# Altium PCB 0060631C.PcbDoc (part 7 of 7)
Units mil, origin at the board's own origin, x right, y up, seen from the top; angles counter-clockwise.
Board outline 5480 x 8249 mil, 6 copper layers (Top Layer, Mid-Layer 1, Mid-Layer 2, Internal Plane 1, Internal Plane 2, Bottom Layer); 514 components, 269 nets, 1375 pads, 1334 vias.
Unrouted connection lines stored in the file: 126.
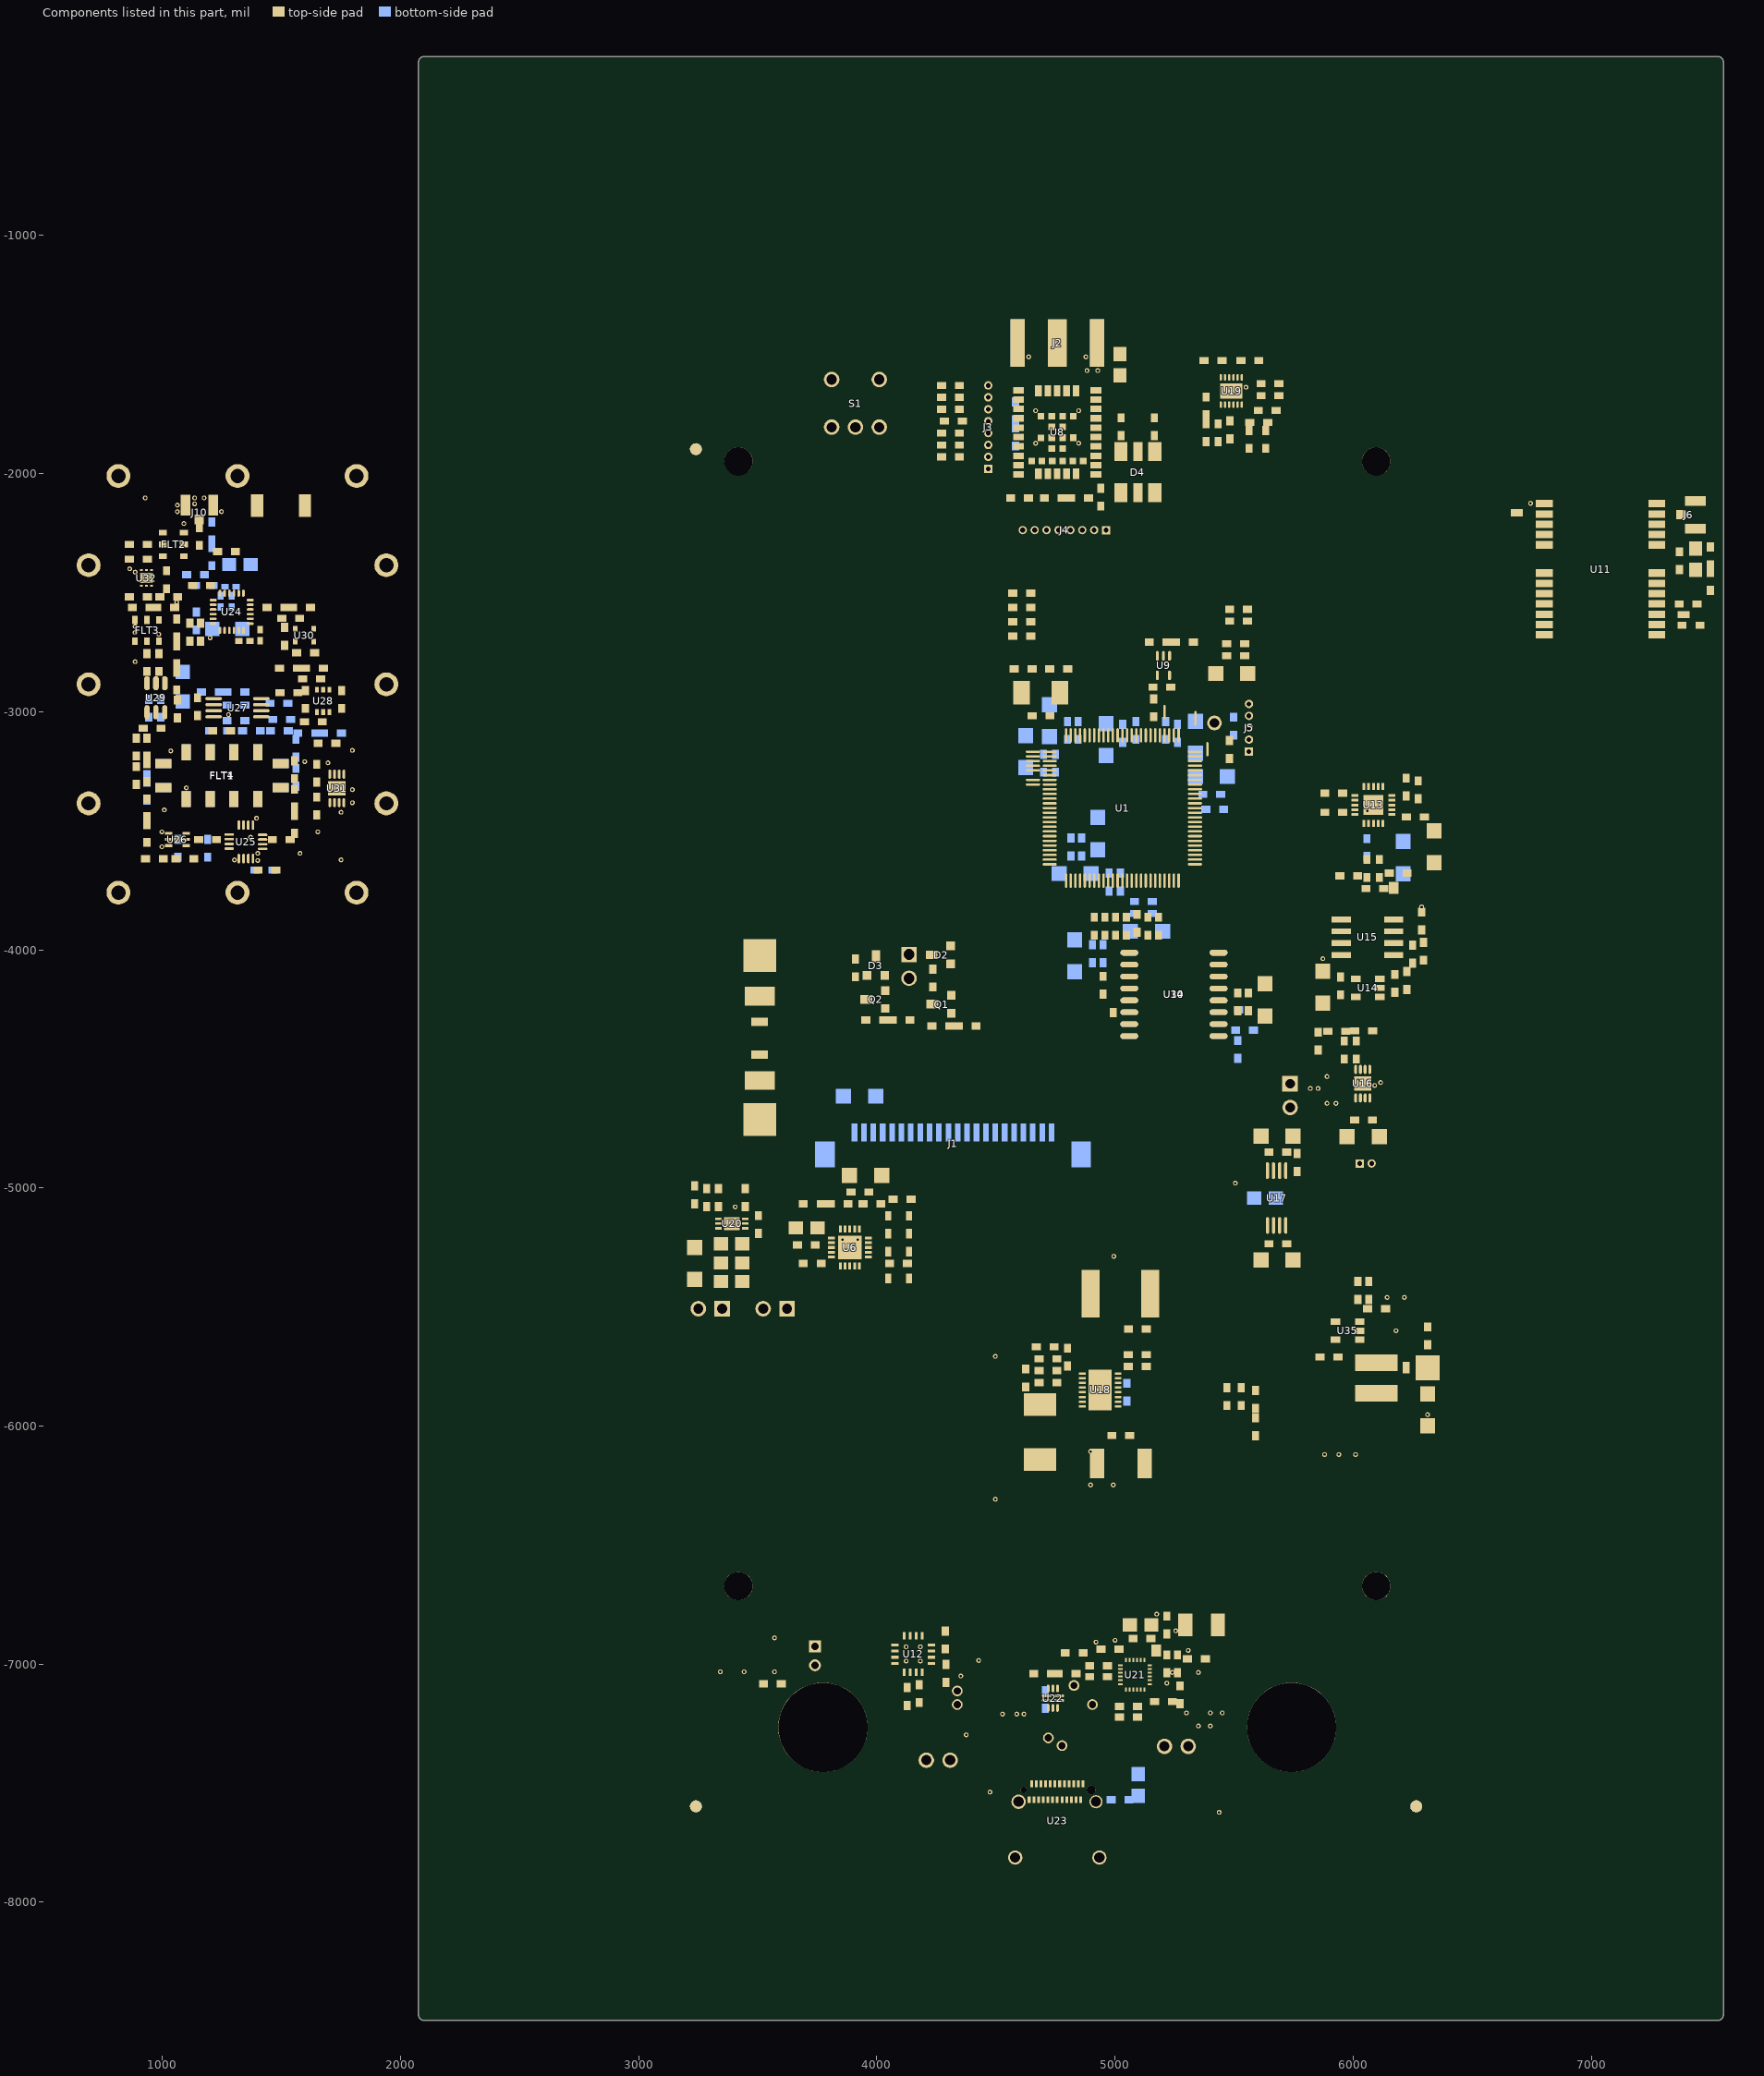
[diagram p11: the components of this part, seen from the top]

## Other copper (continued)
Internal Plane 1 (plane layer: these items are gaps in the copper):
  lines w8: 3115.5,-7605.5 3115.5,-7703.5 3205.5,-7703.5 ; 3115.5,-7578.5 3240.5,-7703.5 4545.5,-7703.5 4545.5,-7846.5 4969.5,-7846.5 4969.5,-7703.5 6274.5,-7703.5 6399.5,-7578.5 6399.5,-1793.5 5896.5,-1793.5 5896.5,-1352.5 4217.5,-1352.5 4217.5,-1422.5 3618.5,-1422.5 3618.5,-1793.5 3115.5,-1793.5 3115.5,-7578.5
  text "00-60163 REV.B" at 6990.05,-4902.68 h75 r90
  text "BLUE SLEUTH PRO LiPo" at 6640.05,-5069.35 h75 r90
Internal Plane 2 (plane layer: these items are gaps in the copper):
  lines w8: 3115.5,-7605.5 3115.5,-7703.5 3205.5,-7703.5 ; 3115.5,-7578.5 3240.5,-7703.5 4545.5,-7703.5 4545.5,-7846.5 4969.5,-7846.5 4969.5,-7703.5 6274.5,-7703.5 6399.5,-7578.5 6399.5,-1793.5 5896.5,-1793.5 5896.5,-1352.5 4217.5,-1352.5 4217.5,-1422.5 3618.5,-1422.5 3618.5,-1793.5 3115.5,-1793.5 3115.5,-7578.5
  text "00-60163 REV.B" at 6990.05,-4902.68 h75 r90
  text "BLUE SLEUTH PRO LiPo" at 6640.05,-5069.35 h75 r90

## Silkscreen, mask and mechanical layers (free items; w line width, h text height)
Top Overlay:
  lines w8: 3115.5,-7605.5 3115.5,-7703.5 3205.5,-7703.5 ; 3662.5,-5110 3687.5,-5110 ; 3725,-5135 3725,-5085 ; 3750,-5110 3725,-5110 ; 4754.5,-3649.6 4754.5,-3680.6 4785.5,-3680.6 ; 4754.5,-3159.6 4754.5,-3128.6 4785.5,-3128.6 ; 5157.5,-7703.5 5157.5,-7545.5 ; 5275.5,-3680.6 5292.8,-3680.6 5306.5,-3666.9 5306.5,-3649.6 ; 5275.5,-3128.6 5306.5,-3128.6 5306.5,-3159.6 ; 5357.5,-7703.5 5357.5,-7545.5 ; 3725,-5110 3687.5,-5135 3687.5,-5085 3725,-5110 ; 3115.5,-7578.5 3240.5,-7703.5 4545.5,-7703.5 4545.5,-7846.5 4969.5,-7846.5 4969.5,-7703.5 6274.5,-7703.5 6399.5,-7578.5 6399.5,-1793.5 5896.5,-1793.5 5896.5,-1352.5 4217.5,-1352.5 4217.5,-1422.5 3618.5,-1422.5 3618.5,-1793.5 3115.5,-1793.5 3115.5,-7578.5 ; 4357.02,-4095 ccw(c4520,-4095) 4520,-4257.98 ccw(c4520,-4095) 4682.98,-4095 ccw(c4520,-4095) 4520,-3932.02 ccw(c4520,-4095) 4357.02,-4095
  lines w20: 1350.3,-3546.2 1350.3,-3546.1 ; 1732.2,-3322.6 1732.3,-3322.6 ; 3391.2,-5150.4 3391.2,-5150.3 ; 6040.1,-4562.4 6040.2,-4562.4
  lines w25: 5030.4,-3404.6 5030.5,-3404.6 ; 5288.8,-3640.9 5288.9,-3640.9
  text "1" at 4374.5,-1991.12 h30 r90
  text "1" at 4956.38,-2379.5 h30
  text "+" at 1510.38,-2626.95 h52.5 r90
  text "+" at 6789.45,-2714.63 h52.5 r180
  text "1" at 5592,-3258.62 h30 r90
  text "+" at 6332.88,-3521.95 h52.5 r90
  text "+" at 5737.88,-4151.95 h52.5 r90
  text "BUZ" at 4436.67,-4156.25 h75
  text "+" at 5862.88,-4254.45 h52.5 r90
  text "1" at 5667,-4573.62 h30 r90
  text "+" at 5965.38,-4804.45 h52.5 r90
  text "00-60163 REV.B" at 6990.05,-4902.68 h75 r90
  text "+" at 3927.88,-4906.95 h52.5 r90
  text "BLUE SLEUTH PRO LiPo" at 6640.05,-5069.35 h75 r90
  text "COMPONENT SILKSCREEN" at 6815.05,-5069.35 h75 r90
  text "+" at 5652.88,-5379.45 h52.5 r90
  text "+" at 6285.38,-5896.95 h52.5 r90
  text "BLUE SLEUTH PRO LiPo" at 3270.5,-7189.43 h60 r90
  text "00-60163B" at 3503,-7624.5 h60
Bottom Overlay:
  lines w8: 3115.5,-7605.5 3115.5,-7703.5 3205.5,-7703.5 ; 4996.2,-7478.7 5046.2,-7478.7 ; 5021.2,-7503.7 5021.2,-7478.7 ; 5021.2,-7441.2 5021.2,-7416.2 ; 5021.2,-7478.7 5046.2,-7441.2 4996.2,-7441.2 5021.2,-7478.7 ; 3115.5,-7578.5 3240.5,-7703.5 4545.5,-7703.5 4545.5,-7846.5 4969.5,-7846.5 4969.5,-7703.5 6274.5,-7703.5 6399.5,-7578.5 6399.5,-1793.5 5896.5,-1793.5 5896.5,-1352.5 4217.5,-1352.5 4217.5,-1422.5 3618.5,-1422.5 3618.5,-1793.5 3115.5,-1793.5 3115.5,-7578.5
  text "+" at 1202.13,-2434.45 h52.5 r90
  text "+" at 1164.63,-2756.95 h52.5 r90
  text "+" at 1049.63,-2761.95 h52.5 r90
  text "+" at 4786.95,-3197.88 h52.5
  text "+" at 4924.45,-3242.88 h52.5
  text "+" at 5411.95,-3245.38 h52.5
  text "+" at 4584.45,-3270.38 h52.5
  text "+" at 5301.95,-3322.88 h52.5
  text "+" at 6114.63,-3561.95 h52.5 r90
  text "+" at 5009.45,-3637.88 h52.5
  text "+" at 4931.95,-3795.38 h52.5
  text "+" at 5286.95,-3935.38 h52.5
  text "+" at 4737.13,-4126.95 h52.5 r90
  text "+" at 3967.13,-4574.45 h52.5 r90
  text "00-60163 REV.B" at 6867.55,-4902.68 h75 r90
  text "SOLDER SILKSCREEN" at 6697.55,-5001.02 h75 r90
  text "BLUE SLEUTH PRO LiPo" at 6517.55,-5069.35 h75 r90
Top Paste:
  lines w8: 3115.5,-7605.5 3115.5,-7703.5 3205.5,-7703.5 ; 3115.5,-7578.5 3240.5,-7703.5 4545.5,-7703.5 4545.5,-7846.5 4969.5,-7846.5 4969.5,-7703.5 6274.5,-7703.5 6399.5,-7578.5 6399.5,-1793.5 5896.5,-1793.5 5896.5,-1352.5 4217.5,-1352.5 4217.5,-1422.5 3618.5,-1422.5 3618.5,-1793.5 3115.5,-1793.5 3115.5,-7578.5
  text "00-60163 REV.B" at 6990.05,-4902.68 h75 r90
  text "BLUE SLEUTH PRO LiPo" at 6640.05,-5069.35 h75 r90
Bottom Paste:
  lines w8: 3115.5,-7605.5 3115.5,-7703.5 3205.5,-7703.5 ; 3115.5,-7578.5 3240.5,-7703.5 4545.5,-7703.5 4545.5,-7846.5 4969.5,-7846.5 4969.5,-7703.5 6274.5,-7703.5 6399.5,-7578.5 6399.5,-1793.5 5896.5,-1793.5 5896.5,-1352.5 4217.5,-1352.5 4217.5,-1422.5 3618.5,-1422.5 3618.5,-1793.5 3115.5,-1793.5 3115.5,-7578.5
  text "00-60163 REV.B" at 6867.55,-4902.68 h75 r90
  text "BLUE SLEUTH PRO LiPo" at 6517.55,-5069.35 h75 r90
Top Solder:
  lines w8: 3115.5,-7605.5 3115.5,-7703.5 3205.5,-7703.5 ; 3115.5,-7578.5 3240.5,-7703.5 4545.5,-7703.5 4545.5,-7846.5 4969.5,-7846.5 4969.5,-7703.5 6274.5,-7703.5 6399.5,-7578.5 6399.5,-1793.5 5896.5,-1793.5 5896.5,-1352.5 4217.5,-1352.5 4217.5,-1422.5 3618.5,-1422.5 3618.5,-1793.5 3115.5,-1793.5 3115.5,-7578.5
  lines w20: 867.5,-2475 867.5,-2400 ; 982.5,-3120 1525,-3120 ; 1010,-3417.5 1502.5,-3417.5 ; 867.5,-3065 867.5,-2642.5 875,-2650 875,-3057.5 867.5,-3065
  lines w30: 872.5,-2255 872.5,-2102.5 1062.5,-2102.5 ; 1142.5,-2102.5 1177.5,-2102.5 ; 1417.5,-2332.5 1800,-2332.5 ; 1507.5,-3672.5 1802.5,-3672.5 1802.5,-3107.5 ; 3377.5,-5135 3377.5,-5112.5 3405,-5112.5 3405,-5132.5
  lines w75: 695,-3760 1945,-3760 1945,-2010 695,-2010 695,-3760
  text "00-60163 REV.B" at 6990.05,-4902.68 h75 r90
  text "BLUE SLEUTH PRO LiPo" at 6640.05,-5069.35 h75 r90
  text "SOLDERMASK COMPONENT" at 6815.05,-5069.35 h75 r90
Bottom Solder:
  lines w8: 3115.5,-7605.5 3115.5,-7703.5 3205.5,-7703.5 ; 3115.5,-7578.5 3240.5,-7703.5 4545.5,-7703.5 4545.5,-7846.5 4969.5,-7846.5 4969.5,-7703.5 6274.5,-7703.5 6399.5,-7578.5 6399.5,-1793.5 5896.5,-1793.5 5896.5,-1352.5 4217.5,-1352.5 4217.5,-1422.5 3618.5,-1422.5 3618.5,-1793.5 3115.5,-1793.5 3115.5,-7578.5
  lines w30: 4602.5,-1385 4610,-1385 ; 4615,-1525 4590,-1525 4590,-1367.5 4905,-1367.5 4905,-1525 ; 4662.5,-1460 4662.5,-1457.5 4835,-1457.5 4835,-1442.5 4662.5,-1442.5 4662.5,-1477.5 4857.5,-1477.5 4857.5,-1420 4640,-1420 4640,-1502.5 4882.5,-1502.5 4882.5,-1395 4617.5,-1395 4617.5,-1525 4905,-1525 ; 4915,-1367.5 4925,-1367.5 4925,-1525 4905,-1525
  text "00-60163 REV.B" at 6867.55,-4902.68 h75 r90
  text "BLUE SLEUTH PRO LiPo" at 6517.55,-5069.35 h75 r90
  text "SOLDERMASK SOLDER SIDE" at 6700.05,-5149.9 h75 r90
Drill Guide:
  text "00-60163 REV.B" at 6990.05,-4902.68 h75 r90
  text "BLUE SLEUTH PRO LiPo" at 6640.05,-5069.35 h75 r90
Mechanical 1:
  lines w2.5: 5002,-3404.6 5054,-3404.6 ; 5030.5,-3435.5 5030.5,-3374.5 ; 5877.28,-2477 ccw(c5892.9,-2477) 5892.9,-2492.62 ccw(c5892.9,-2477) 5908.52,-2477 ccw(c5892.9,-2477) 5892.9,-2461.38 ccw(c5892.9,-2477) 5877.28,-2477
  lines w8: 3115.5,-7605.5 3115.5,-7703.5 3205.5,-7703.5 ; 3662.5,-5110 3687.5,-5110 ; 3725,-5135 3725,-5085 ; 3750,-5110 3725,-5110 ; 4257.5,-7720 4257.5,-7637.5 ; 4754.5,-3649.6 4754.5,-3680.6 4785.5,-3680.6 ; 4754.5,-3159.6 4754.5,-3128.6 4785.5,-3128.6 ; 4757.5,-7938 4757.5,-7869.5 ; 4757.5,-1406 4757.5,-1300 ; 5157.5,-7703.5 5157.5,-7545.5 ; 5257.5,-7714 5257.5,-7635.5 ; 5275.5,-3680.6 5292.8,-3680.6 5306.5,-3666.9 5306.5,-3649.6 ; 5275.5,-3128.6 5306.5,-3128.6 5306.5,-3159.6 ; 5357.5,-7703.5 5357.5,-7545.5 ; 3725,-5110 3687.5,-5135 3687.5,-5085 3725,-5110 ; 3115.5,-7578.5 3240.5,-7703.5 4545.5,-7703.5 4545.5,-7846.5 4969.5,-7846.5 4969.5,-7703.5 6274.5,-7703.5 6399.5,-7578.5 6399.5,-1793.5 5896.5,-1793.5 5896.5,-1352.5 4217.5,-1352.5 4217.5,-1422.5 3618.5,-1422.5 3618.5,-1793.5 3115.5,-1793.5 3115.5,-7578.5 ; 3293.5,-6672.5 ccw(c3418.5,-6672.5) 3418.5,-6797.5 ccw(c3418.5,-6672.5) 3543.5,-6672.5 ccw(c3418.5,-6672.5) 3418.5,-6547.5 ccw(c3418.5,-6672.5) 3293.5,-6672.5 ; 3293.5,-1948.5 ccw(c3418.5,-1948.5) 3418.5,-2073.5 ccw(c3418.5,-1948.5) 3543.5,-1948.5 ccw(c3418.5,-1948.5) 3418.5,-1823.5 ccw(c3418.5,-1948.5) 3293.5,-1948.5 ; 4357.02,-4095 ccw(c4520,-4095) 4520,-4257.98 ccw(c4520,-4095) 4682.98,-4095 ccw(c4520,-4095) 4520,-3932.02 ccw(c4520,-4095) 4357.02,-4095 ; 5971.5,-6672.5 ccw(c6096.5,-6672.5) 6096.5,-6797.5 ccw(c6096.5,-6672.5) 6221.5,-6672.5 ccw(c6096.5,-6672.5) 6096.5,-6547.5 ccw(c6096.5,-6672.5) 5971.5,-6672.5 ; 5971.5,-1948.5 ccw(c6096.5,-1948.5) 6096.5,-2073.5 ccw(c6096.5,-1948.5) 6221.5,-1948.5 ccw(c6096.5,-1948.5) 6096.5,-1823.5 ccw(c6096.5,-1948.5) 5971.5,-1948.5
  lines w20: 3391.2,-5150.4 3391.2,-5150.3 ; 3845.3,-3666.2 3845.3,-3666.1 ; 4227.2,-3442.6 4227.3,-3442.6 ; 6040.1,-4562.4 6040.2,-4562.4
  lines w25: 5030.4,-3404.6 5030.5,-3404.6 ; 5288.8,-3640.9 5288.9,-3640.9
  text "1" at 4374.5,-1991.12 h30 r90
  text "1" at 4956.38,-2379.5 h30
  text "+" at 4005.38,-2746.95 h52.5 r90
  text "+" at 5639.45,-2789.63 h52.5 r180
  text "1" at 5592,-3258.62 h30 r90
  text "+" at 6332.88,-3521.95 h52.5 r90
  text "+" at 5737.88,-4151.95 h52.5 r90
  text "BUZ" at 4436.67,-4156.25 h75
  text "+" at 5862.88,-4254.45 h52.5 r90
  text "1" at 5667,-4573.62 h30 r90
  text "+" at 5965.38,-4804.45 h52.5 r90
  text "00-60163 REV.B" at 6990.05,-4902.68 h75 r90
  text "+" at 3927.88,-4906.95 h52.5 r90
  text "BLUE SLEUTH PRO LiPo" at 6640.05,-5069.35 h75 r90
  text "COMPONENT SILKSCREEN" at 6815.05,-5069.35 h75 r90
  text "+" at 5652.88,-5379.45 h52.5 r90
  text "+" at 6285.38,-5896.95 h52.5 r90
  text "BLUE SLEUTH PRO LiPo" at 3270.5,-7189.43 h60 r90
  text "00-60163B" at 3503,-7624.5 h60
Mechanical 2:
  lines w8: 3115.5,-7605.5 3115.5,-7703.5 3205.5,-7703.5 ; 4996.2,-7478.7 5046.2,-7478.7 ; 5021.2,-7503.7 5021.2,-7478.7 ; 5021.2,-7441.2 5021.2,-7416.2 ; 5021.2,-7478.7 5046.2,-7441.2 4996.2,-7441.2 5021.2,-7478.7 ; 3115.5,-7578.5 3240.5,-7703.5 4545.5,-7703.5 4545.5,-7846.5 4969.5,-7846.5 4969.5,-7703.5 6274.5,-7703.5 6399.5,-7578.5 6399.5,-1793.5 5896.5,-1793.5 5896.5,-1352.5 4217.5,-1352.5 4217.5,-1422.5 3618.5,-1422.5 3618.5,-1793.5 3115.5,-1793.5 3115.5,-7578.5
  text "+" at 3697.13,-2554.45 h52.5 r90
  text "+" at 3659.63,-2876.95 h52.5 r90
  text "+" at 3544.63,-2881.95 h52.5 r90
  text "+" at 4786.95,-3197.88 h52.5
  text "+" at 4924.45,-3242.88 h52.5
  text "+" at 5411.95,-3245.38 h52.5
  text "+" at 4584.45,-3270.38 h52.5
  text "+" at 5301.95,-3322.88 h52.5
  text "+" at 6114.63,-3561.95 h52.5 r90
  text "+" at 5009.45,-3637.88 h52.5
  text "+" at 4931.95,-3795.38 h52.5
  text "+" at 5286.95,-3935.38 h52.5
  text "+" at 4737.13,-4126.95 h52.5 r90
  text "+" at 3967.13,-4574.45 h52.5 r90
  text "00-60163 REV.B" at 6867.55,-4902.68 h75 r90
  text "SOLDER SILKSCREEN" at 6697.55,-5001.02 h75 r90
  text "BLUE SLEUTH PRO LiPo" at 6517.55,-5069.35 h75 r90
Mechanical 4:
  lines w8: 3115.5,-7605.5 3115.5,-7703.5 3205.5,-7703.5 ; 3115.5,-7578.5 3240.5,-7703.5 4545.5,-7703.5 4545.5,-7846.5 4969.5,-7846.5 4969.5,-7703.5 6274.5,-7703.5 6399.5,-7578.5 6399.5,-1793.5 5896.5,-1793.5 5896.5,-1352.5 4217.5,-1352.5 4217.5,-1422.5 3618.5,-1422.5 3618.5,-1793.5 3115.5,-1793.5 3115.5,-7578.5
  text "00-60163 REV.B" at 6990.05,-4902.68 h75 r90
  text "BLUE SLEUTH PRO LiPo" at 6640.05,-5069.35 h75 r90
Mechanical 5:
  lines w8: 3115.5,-7605.5 3115.5,-7703.5 3205.5,-7703.5 ; 3115.5,-7578.5 3240.5,-7703.5 4545.5,-7703.5 4545.5,-7846.5 4969.5,-7846.5 4969.5,-7703.5 6274.5,-7703.5 6399.5,-7578.5 6399.5,-1793.5 5896.5,-1793.5 5896.5,-1352.5 4217.5,-1352.5 4217.5,-1422.5 3618.5,-1422.5 3618.5,-1793.5 3115.5,-1793.5 3115.5,-7578.5
  text "00-60163 REV.B" at 6990.05,-4902.68 h75 r90
  text "BLUE SLEUTH PRO LiPo" at 6640.05,-5069.35 h75 r90
Mechanical 6:
  lines w8: 3115.5,-7605.5 3115.5,-7703.5 3205.5,-7703.5 ; 3115.5,-7578.5 3240.5,-7703.5 4545.5,-7703.5 4545.5,-7846.5 4969.5,-7846.5 4969.5,-7703.5 6274.5,-7703.5 6399.5,-7578.5 6399.5,-1793.5 5896.5,-1793.5 5896.5,-1352.5 4217.5,-1352.5 4217.5,-1422.5 3618.5,-1422.5 3618.5,-1793.5 3115.5,-1793.5 3115.5,-7578.5
  text "00-60163 REV.B" at 6990.05,-4902.68 h75 r90
  text "BLUE SLEUTH PRO LiPo" at 6640.05,-5069.35 h75 r90
Mechanical 7:
  lines w8: 3115.5,-7605.5 3115.5,-7703.5 3205.5,-7703.5 ; 3115.5,-7578.5 3240.5,-7703.5 4545.5,-7703.5 4545.5,-7846.5 4969.5,-7846.5 4969.5,-7703.5 6274.5,-7703.5 6399.5,-7578.5 6399.5,-1793.5 5896.5,-1793.5 5896.5,-1352.5 4217.5,-1352.5 4217.5,-1422.5 3618.5,-1422.5 3618.5,-1793.5 3115.5,-1793.5 3115.5,-7578.5
  text "00-60163 REV.B" at 6990.05,-4902.68 h75 r90
  text "BLUE SLEUTH PRO LiPo" at 6640.05,-5069.35 h75 r90
Mechanical 8:
  lines w8: 3115.5,-7605.5 3115.5,-7703.5 3205.5,-7703.5 ; 3115.5,-7578.5 3240.5,-7703.5 4545.5,-7703.5 4545.5,-7846.5 4969.5,-7846.5 4969.5,-7703.5 6274.5,-7703.5 6399.5,-7578.5 6399.5,-1793.5 5896.5,-1793.5 5896.5,-1352.5 4217.5,-1352.5 4217.5,-1422.5 3618.5,-1422.5 3618.5,-1793.5 3115.5,-1793.5 3115.5,-7578.5
  text "00-60163 REV.B" at 6990.05,-4902.68 h75 r90
  text "BLUE SLEUTH PRO LiPo" at 6640.05,-5069.35 h75 r90
Mechanical 9:
  lines w8: 3115.5,-7605.5 3115.5,-7703.5 3205.5,-7703.5 ; 3115.5,-7578.5 3240.5,-7703.5 4545.5,-7703.5 4545.5,-7846.5 4969.5,-7846.5 4969.5,-7703.5 6274.5,-7703.5 6399.5,-7578.5 6399.5,-1793.5 5896.5,-1793.5 5896.5,-1352.5 4217.5,-1352.5 4217.5,-1422.5 3618.5,-1422.5 3618.5,-1793.5 3115.5,-1793.5 3115.5,-7578.5
  text "00-60163 REV.B" at 6990.05,-4902.68 h75 r90
  text "BLUE SLEUTH PRO LiPo" at 6640.05,-5069.35 h75 r90
Mechanical 10:
  lines w8: 3115.5,-7605.5 3115.5,-7703.5 3205.5,-7703.5 ; 3115.5,-7578.5 3240.5,-7703.5 4545.5,-7703.5 4545.5,-7846.5 4969.5,-7846.5 4969.5,-7703.5 6274.5,-7703.5 6399.5,-7578.5 6399.5,-1793.5 5896.5,-1793.5 5896.5,-1352.5 4217.5,-1352.5 4217.5,-1422.5 3618.5,-1422.5 3618.5,-1793.5 3115.5,-1793.5 3115.5,-7578.5
  text "00-60163 REV.B" at 6990.05,-4902.68 h75 r90
  text "BLUE SLEUTH PRO LiPo" at 6640.05,-5069.35 h75 r90
Mechanical 11:
  lines w8: 3115.5,-7605.5 3115.5,-7703.5 3205.5,-7703.5 ; 3115.5,-7578.5 3240.5,-7703.5 4545.5,-7703.5 4545.5,-7846.5 4969.5,-7846.5 4969.5,-7703.5 6274.5,-7703.5 6399.5,-7578.5 6399.5,-1793.5 5896.5,-1793.5 5896.5,-1352.5 4217.5,-1352.5 4217.5,-1422.5 3618.5,-1422.5 3618.5,-1793.5 3115.5,-1793.5 3115.5,-7578.5
  text "00-60163 REV.B" at 6990.05,-4902.68 h75 r90
  text "BLUE SLEUTH PRO LiPo" at 6640.05,-5069.35 h75 r90
Mechanical 12:
  lines w8: 3115.5,-7605.5 3115.5,-7703.5 3205.5,-7703.5 ; 3115.5,-7578.5 3240.5,-7703.5 4545.5,-7703.5 4545.5,-7846.5 4969.5,-7846.5 4969.5,-7703.5 6274.5,-7703.5 6399.5,-7578.5 6399.5,-1793.5 5896.5,-1793.5 5896.5,-1352.5 4217.5,-1352.5 4217.5,-1422.5 3618.5,-1422.5 3618.5,-1793.5 3115.5,-1793.5 3115.5,-7578.5
  text "00-60163 REV.B" at 6990.05,-4902.68 h75 r90
  text "BLUE SLEUTH PRO LiPo" at 6640.05,-5069.35 h75 r90
Mechanical 13:
  lines w8: 3115.5,-7605.5 3115.5,-7703.5 3205.5,-7703.5 ; 3115.5,-7578.5 3240.5,-7703.5 4545.5,-7703.5 4545.5,-7846.5 4969.5,-7846.5 4969.5,-7703.5 6274.5,-7703.5 6399.5,-7578.5 6399.5,-1793.5 5896.5,-1793.5 5896.5,-1352.5 4217.5,-1352.5 4217.5,-1422.5 3618.5,-1422.5 3618.5,-1793.5 3115.5,-1793.5 3115.5,-7578.5
  text "00-60163 REV.B" at 6990.05,-4902.68 h75 r90
  text "BLUE SLEUTH PRO LiPo" at 6640.05,-5069.35 h75 r90
Mechanical 14:
  text "RECESS BOARD UNDER S1 FOR TOGGLE BUTTON" at 3543.52,-421.5 h90
  text "R93: WSLP0805R0100FEB or 200FEB ?" at 3804.52,-700.5 h90
  text "SAME ON WOLFHOUND ULTRA" at 4235.83,-872.5 h90
  text "CHANGE TITLE TO BLUE SLEUTH PRO LiPo" at 3685.02,-8214.5 h90
  text "FIX SHORTED \"THM\" VIA TO +3.3V, RIGHT OF R85" at 3315.02,-8470.5 h90
Drill Drawing:
  lines w8: -4,-2704 3609,-2704 ; -4,-2700 -4,0 ; -4,4 3609,4 ; 0,-2500 3605,-2500 ; 0,-2350 3605,-2350 ; 0,-2200 3605,-2200 ; 0,-2050 3605,-2050 ; 0,-1900 3605,-1900 ; 0,-1750 3605,-1750 ; 0,-1600 3605,-1600 ; 0,-1450 3605,-1450 ; 0,-1300 3605,-1300 ; 0,-1150 3605,-1150 ; 0,-1000 3605,-1000 ; 0,-850 3605,-850 ; 0,-700 3605,-700 ; 0,-550 3605,-550 ; 0,-400 3605,-400 ; 0,-396 3605,-396 ; 0,-200 3605,-200 ; 0,-196 3605,-196 ; 128.5,-2125 228.5,-2125 ; 128.5,-2025 228.5,-1925 ; 128.5,-1925 228.5,-2025 ; 153.5,-1075 203.5,-1075 ; 153.5,-625 203.5,-625 ; 153.5,-500 203.5,-450 ; 153.5,-450 203.5,-500 ; 163.5,-1830 173.5,-1840 183.5,-1840 193.5,-1830 ; 168.5,-2275 188.5,-2275 ; 178.5,-2285 178.5,-2265 ; 178.5,-2175 178.5,-2075 ; 178.5,-1100 178.5,-1050 ; 178.5,-650 178.5,-600 ; 357,-2500 357,-200 ; 361,-2500 361,-200 ; 1173.17,-2500 1173.17,-200 ; 1951.83,-2700 1951.83,-200 ; 2490.83,-2700 2490.83,-200 ; 3609,-2700 3609,0 ; 128.5,-2475 128.5,-2375 ; 128.5,-2475 228.5,-2475 ; 128.5,-2475 228.5,-2375 ; 128.5,-2375 228.5,-2375 ; 128.5,-2375 228.5,-2475 ; 153.5,-950 153.5,-900 ; 153.5,-950 203.5,-950 ; 153.5,-950 203.5,-900 ; 153.5,-900 203.5,-900 ; 153.5,-900 203.5,-950 ; 203.5,-950 203.5,-900 ; 228.5,-2475 228.5,-2375 ; 0,-2700 3605,-2700 3605,0 0,0 0,-2700 ; 128.5,-2275 178.5,-2225 228.5,-2275 178.5,-2325 128.5,-2275 ; 153.5,-1835 153.5,-1815 168.5,-1800 188.5,-1800 203.5,-1815 203.5,-1835 188.5,-1850 168.5,-1850 153.5,-1835 ; 153.5,-1685 153.5,-1665 178.5,-1690 203.5,-1665 203.5,-1685 178.5,-1660 153.5,-1685 ; 153.5,-1535 178.5,-1510 203.5,-1535 153.5,-1535 ; 153.5,-1385 153.5,-1365 168.5,-1350 188.5,-1350 203.5,-1365 203.5,-1385 188.5,-1400 168.5,-1400 153.5,-1385 ; 153.5,-1225 153.5,-1200 178.5,-1200 178.5,-1250 203.5,-1250 203.5,-1225 153.5,-1225 ; 153.5,-1100 153.5,-1050 203.5,-1050 203.5,-1100 153.5,-1100 ; 153.5,-775 178.5,-750 203.5,-775 178.5,-800 153.5,-775 ; 168.5,-1815 173.5,-1815 173.5,-1810 168.5,-1810 168.5,-1815 ; 183.5,-1815 183.5,-1810 188.5,-1810 188.5,-1815 183.5,-1815
  text ".Legend" at 0,0 h60
  text "00-60163 REV.B" at 6990.05,-4902.68 h75 r90
  text "BLUE SLEUTH PRO LiPo" at 6640.05,-5069.35 h75 r90

## Text inside footprints (layer, text, board x,y; h text height)
U8: Mechanical 1 "B222" at 4732.48,-1751.15 h15; Mechanical 1 "B221" at 4735.08,-1816.55 h15